# Altium PCB DC Load Control Board.PcbDoc (part 2 of 2)
Units mm, origin at the board's own origin, x right, y up, seen from the top; angles counter-clockwise.
Board outline 70 x 74.5 mm, 4 copper layers (Top Layer, Layer 1, Layer 2, Bottom Layer), stack 0.603 mm thick; 93 components, 78 nets, 360 pads, 209 vias.
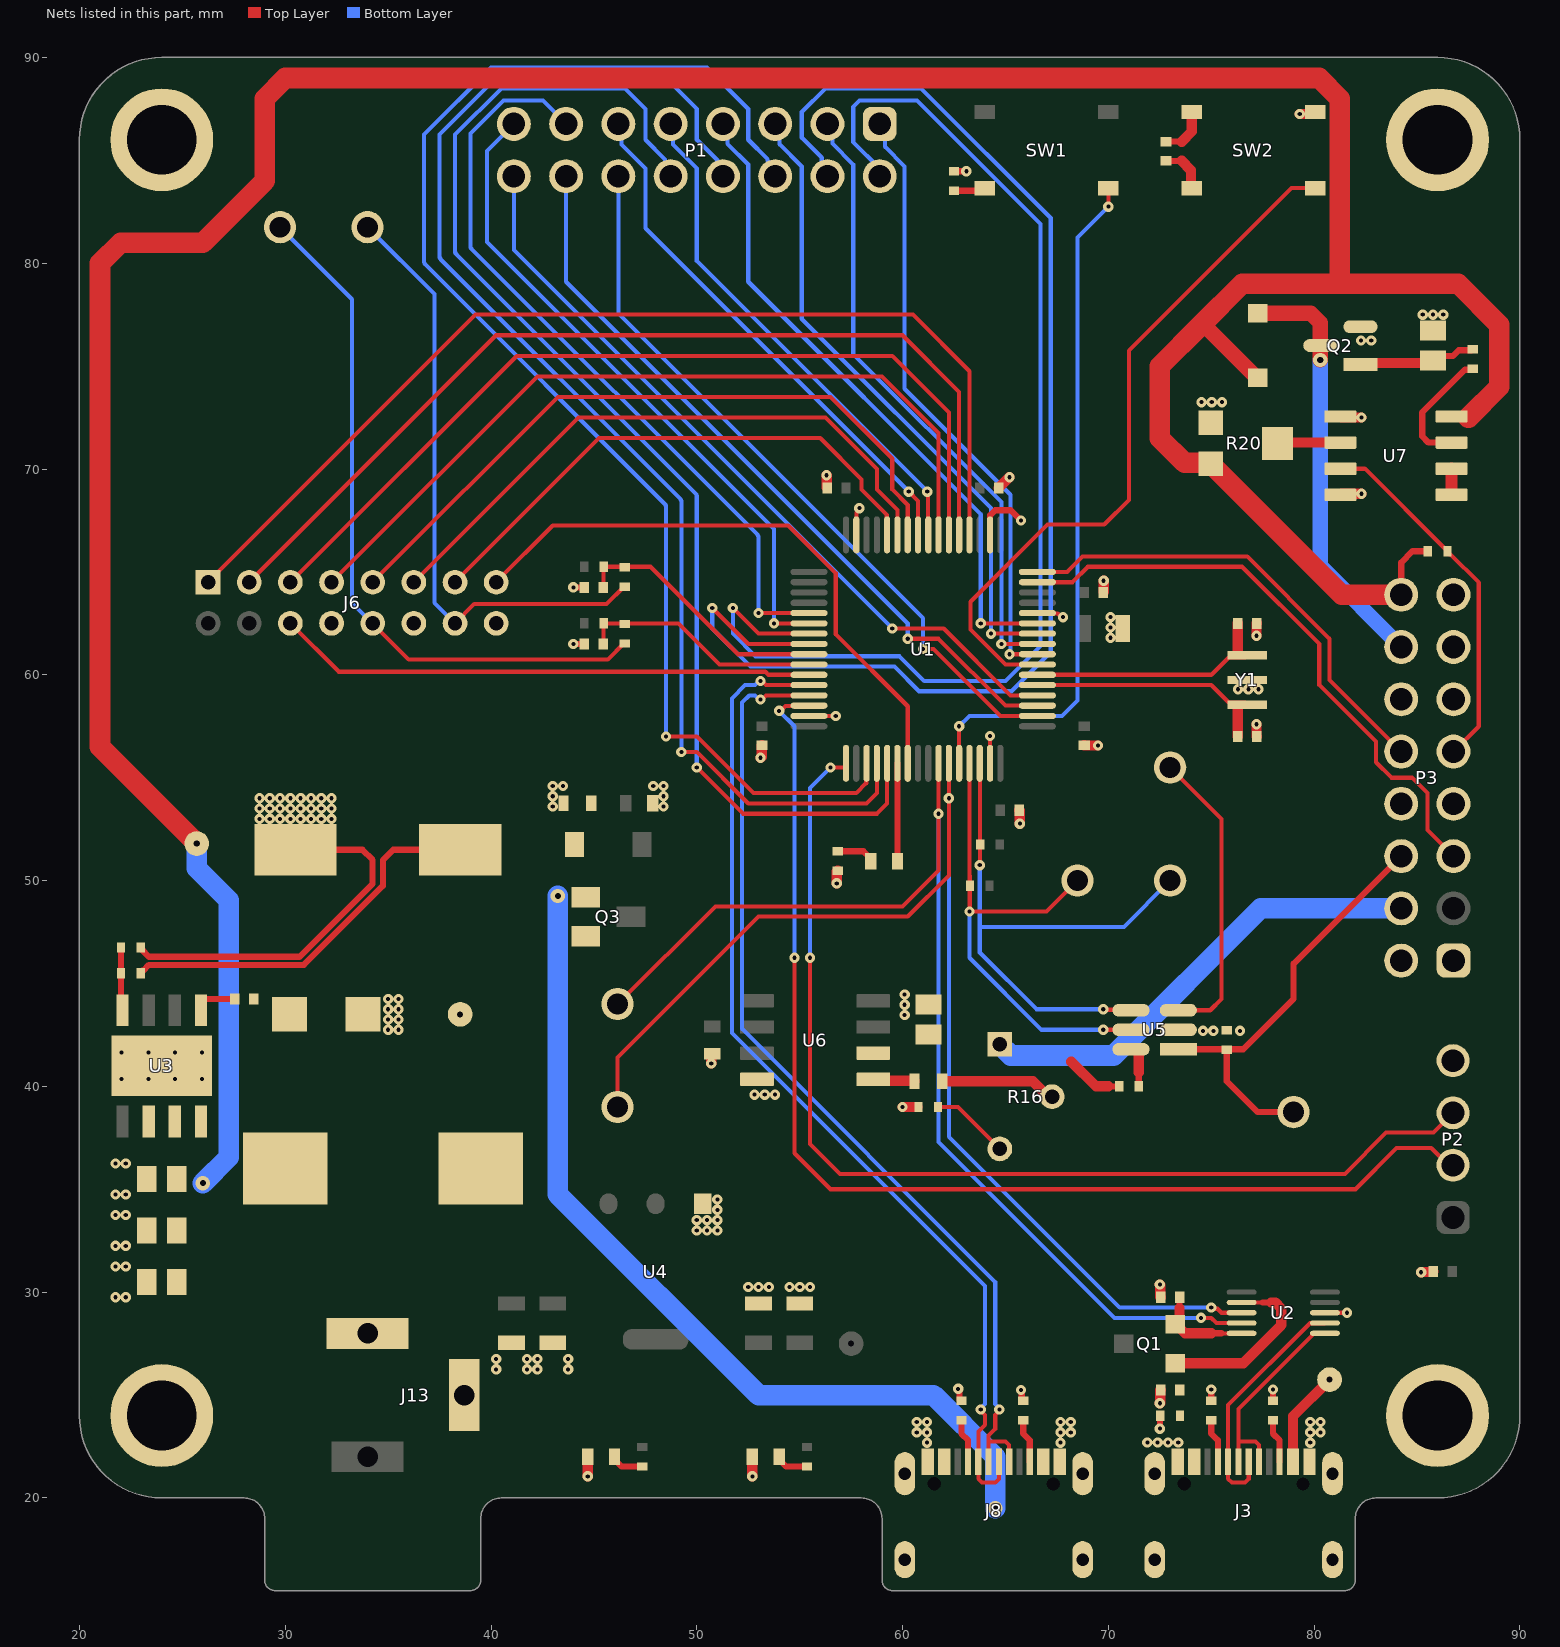
[diagram p4: the nets of this part, all layers, seen from the top]

## Via types
v1: diameter 0.5, hole 0.2, Top Layer to Bottom Layer, tented both sides, 185 vias
v2: diameter 0.7, hole 0.3, Top Layer to Bottom Layer, tented both sides, 16 vias
v3: diameter 0.5, hole 0.2, Top Layer to Bottom Layer, 8 vias

## Nets (pads, with @x,y where several pads share a name; then routed paths per layer and width w, separated by ;. In a path a pad name is that pad's centre, name@x,y a point inside that pad or via, vN(x,y) a via of type N, cw(c..) or ccw(c..) an arc to the next point about the centre after c; other vN are vias at no path point) (continued)
+4.096V: C24.1 J10.1 P3.4 P3.13 R15.2 R16.1 U5.3 U6.6 | length 40.1
  Top Layer w0.2: J10.1@73,55.5 75.5,53 75.5,44.25 74.95,43.7 U5.3@73.4,43.7
  Top Layer w0.3: 70,40 R15.2@70.525,40
  Top Layer w0.5: 68.2,41.2 69.4,40 70,40
  Bottom Layer w1: R16.1@64.725,42.04 65.265,41.5 70.25,41.5 77.4,48.65 P3.4@84.23,48.65
"+5 USB": C1.1 D6.2 J3.A4B9 J3.B4A9 J8.A4B9 J8.B4A9 Q1.1 Q3.1 R3.2 R26.2 TP1.1 U2.7 | length 57
  Top Layer w0.2: U2.7@76.475,29.5 77.5,29.5
  Top Layer w0.3: 77.5,29.5 77.9,29.5
  Top Layer w0.5: Q1.1@73.25,26.55 76.55,26.55 78.4,28.4 78.4,29.207 78.107,29.5 77.9,29.5 ; J3.B4A9@78.97,21.758 78.97,23.97 TP1.1@80.75,25.75
  Bottom Layer w1: v2(43.25,49.25) 43.25,34.75 53,25 61.5,25 64.5,22 v2(64.5,19.5)
+5V: C18.2 L1.2 Q3.2 R10.2 TP3.1 | length 18.8
  Top Layer w0.3: R10.2@22.975,45.5 22.975,45.55 23.048,45.623 23.098,45.623 23.375,45.9 30.9,45.9 34.75,49.75 34.75,51 35.25,51.5 C18.2@38.5,51.5
+12V: C15.1 C16.1 C17.1 D5.2 J13.1 P3.16 R19.1 R20.3 TP2.1 U3.7 U7.8 | length 172.9
  Top Layer w0.3: P3.16@84.231,63.891 84.231,65.456 84.775,66 R19.1@85.525,66
  Top Layer w0.75: 74.5,77 74.65,77 77.225,74.425 D5.2@77.25,74.425
  Top Layer w1: TP2.1@25.7,51.8 21,56.5 21,80 22,81 26,81 29,84 29,88 30,89 80.25,89 81.25,88 81.25,79 ; P3.16@84.23,63.89 81.335,63.89 R20.3@74.975,70.25 74.927,70.298 73.702,70.298 72.5,71.5 72.5,75 74.5,77 76.5,79 81.25,79 ; 87.5,72.5 89,74 89,77 87,79 81.25,79
  Bottom Layer w1: TP2.1@25.7,51.8 25.7,50.6 27.25,49.05 27.25,36.55 v2(26,35.3)
Boot0: SW1.4 U1.60 | length 33.6
  Top Layer w0.2: U1.60@62.75,55.7 v1(62.75,57.5) ; v1(70,82.75) SW1.4@70,83.65
  Bottom Layer w0.2: v1(62.75,57.5) 63.25,58 67.75,58 68.5,58.75 68.5,81.25 v1(70,82.75)
BUCK_PH: C14.2 D2.1 L1.1 U3.8
COL1: J6.9 U1.26 | length 34.2
  Top Layer w0.2: J6.9@34.25,64.5 43.25,73.5 56.5,73.5 59.5,70.5 59.5,69 60.25,68.25 U1.26@60.25,66.8
COL2: J6.11 U1.27 | length 30.5
  Top Layer w0.2: J6.11@36.25,64.5 44.25,72.5 56.25,72.5 58.75,70 58.75,69 59.75,68 U1.27@59.75,66.8
COL3: J6.13 U1.28 | length 26.7
  Top Layer w0.2: J6.13@38.25,64.5 45.25,71.5 56,71.5 58,69.5 58,69 59.232,67.768 59.232,66.818 U1.28@59.25,66.8
COL4: J6.15 U1.55 | length 29.3
  Top Layer w0.2: J6.15@40.25,64.5 43,67.25 54.445,67.25 56.75,64.945 56.75,61.972 60.25,58.472 U1.55@60.25,55.7
DUT_ISEN: P3.5 U1.15 | length 29.2
  Top Layer w0.2: U1.15@66.55,64.5 68.25,64.5 69,65.25 76.5,65.25 80.25,61.5 80.25,59.5 83,56.75 83,55.75 83.75,55 84.75,55 85.5,54.25 85.5,52.46 P3.5@86.77,51.19
DUT_VSEN: P3.10 U1.16 | length 23.1
  Top Layer w0.2: U1.16@66.55,65 68,65 68.75,65.75 76.75,65.75 80.75,61.75 80.75,59.75 P3.10@84.23,56.27
ENCA: C27.1 R23.2 R25.1 U1.41 | length 12.7
  Top Layer w0.2: C27.1@45.46,64.25 45.467,64.258 45.467,65.242 R23.2@45.475,65.25 47.75,65.25 52,61 U1.41@55.45,61
ENCA_Raw: J6.14 J11.1 R25.2 | length 30
  Top Layer w0.2: J6.14@38.25,62.5 39.183,63.433 45.608,63.433 46.45,64.275 R25.2@46.5,64.275
  Bottom Layer w0.2: J11.1@34,81.75 37.25,78.5 37.25,63.5 J6.14@38.25,62.5
ENCB: C26.1 R22.2 R24.1 U1.42 | length 11.8
  Top Layer w0.2: C26.1@45.46,61.5 45.467,61.507 45.467,62.492 R22.2@45.475,62.5 49.1,62.5 51.1,60.5 U1.42@55.45,60.5
ENCB_Raw: J6.10 J7.1 R24.2 | length 34.4
  Top Layer w0.2: J6.10@34.25,62.5 36,60.75 45.675,60.75 46.45,61.525 R24.2@46.5,61.525
  Bottom Layer w0.2: J7.1@29.75,81.75 33.25,78.25 33.25,63.5 J6.10@34.25,62.5
ENCSW: J6.6 U1.43 | length 26.2
  Top Layer w0.2: J6.6@30.25,62.5 32.6,60.15 53.327,60.15 53.477,60 U1.43@55.45,60
FAN-: D5.1 P3.14 Q2.3 | length 20.6
  Top Layer w0.75: D5.1@77.25,77.575 79.825,77.575 80.3,77.1 v2(80.3,75.3)
  Bottom Layer w0.75: v2(80.3,75.3) 80.3,65.28 P3.14@84.23,61.35
GND: C1.2 C2.1 C3.1 C4.1 C6.2 C7.2 C8.2 C9.2 C10.2 C11.2 C12.2 C13.2 C15.2 C16.2 C17.2 C18.1 C19.2 C20.2 C21.2 C22.2 C23.1 C24.2 C25.2 C26.2 C27.2 C28.1 D2.2 D3.2 D4.2 J3.1 J3.2 J3.3 J3.4 J3.A1B12 J3.B1A12 J6.8 J6.12 J6.16 J8.1 J8.2 J8.3 J8.4 J8.A1B12 J8.B1A12 J13.3 P2.4 P3.1 P3.2 P3.7 P3.8 P3.11 P3.12 P3.15 pad.11 Q2.2 R3.1 R4.1 R5.1 R6.1 R7.1 R8.1 R9.1 R12.1 R14.1 R18.1 R20.1 R26.1 SW2.2 U1.12 U1.18 U1.31 U1.47 U1.63 U2.3 U3.6 U3.9 U4.1 U5.2 U6.4 U7.1 U7.4 Y1.2 | length 45.5
  Top Layer w0.2: U1.47@55.45,58 v1(56.75,58) ; U1.31@57.75,66.8 57.769,66.819 57.769,67.888 57.9,68.019 v1(57.9,68.1) ; U1.63@64.25,55.7 v1(64.25,57.025) ; U1.12@66.55,63 66.569,62.981 67.538,62.981 67.719,62.8 v1(67.8,62.8) ; U2.3@80.525,29 v1(81.6,29)
  Top Layer w0.3: R12.1@22.975,46.75 23.048,46.677 23.048,46.627 23.375,46.3 30.7,46.3 34.242,49.842 34.242,51.008 33.75,51.5 C18.1@30.5,51.5 ; v1(44,61.5) C26.2@44.54,61.5 ; v1(44,64.25) C27.2@44.54,64.25 ; R7.1@62.5,84.475 62.504,84.471 63.096,84.471 v1(63.1,84.467) ; v1(62.7,25.3) 62.7,25.246 62.76,25.186 62.76,24.775 62.81,24.725 R9.1@62.86,24.725 ; U1.18@64.25,66.8 64.25,67.75 64.5,68 65.25,68 v1(65.75,67.5) ; v1(65.75,25.25) 65.788,25.212 65.788,24.775 65.838,24.725 R8.1@65.86,24.725 ; v1(72.5,23.367) 72.512,23.38 72.512,23.987 R3.1@72.525,24 ; R6.1@75,24.725 v1(75,25.267) ; R5.1@78,24.725 v1(78,25.267)
  Top Layer w0.5: v1(44.7,21.05) D3.2@44.7,22 ; v1(50.7,41.116) 50.7,41.56 50.73,41.59 C23.1@50.75,41.59 ; v1(52.7,21.05) D4.2@52.7,22 ; v1(53.1,55.967) 53.15,56.017 53.15,56.56 C8.2@53.17,56.58 ; v1(56.3,69.7) 56.31,69.69 56.31,69.1 C9.2@56.33,69.08 ; v1(56.8,49.867) 56.8,50.425 R4.1@56.85,50.475 ; v1(60,39) R18.1@60.709,39 ; C10.2@64.67,69.08 65.19,69.6 v1(65.2,69.6) ; C7.2@65.67,53.42 65.69,53.4 65.69,52.777 v1(65.7,52.767) ; C12.2@68.83,56.58 68.843,56.567 v1(69.5,56.567) ; C11.2@69.77,64.02 v1(69.77,64.57) ; v1(72.5,24.6) 72.52,24.62 72.52,25.23 C1.2@72.54,25.25 ; v1(72.5,30.367) 72.52,30.347 72.52,29.77 C2.1@72.54,29.75 ; v1(77.2,57.6) 77.2,57.01 C4.1@77.21,57 ; v1(77.2,61.9) 77.2,62.49 C3.1@77.21,62.5 ; v1(79.3,87.25) 80,87.25 SW2.2@80.05,87.3 ; U7.4@81.275,68.745 81.325,68.795 82.295,68.795 v1(82.3,68.8) ; U7.1@81.275,72.555 81.325,72.505 82.295,72.505 v1(82.3,72.5) ; v1(85.2,30.967) 85.213,30.98 85.77,30.98 C6.2@85.79,31
  other v1: 61.187,22.687 67.672,22.687 71.894,22.694 72.394,22.694 72.894,22.694 73.394,22.694 79.812,22.687 60.687,23.187 61.187,23.187 67.672,23.187 68.172,23.187 79.812,23.187 80.312,23.187 60.687,23.687 61.187,23.687 67.672,23.687 68.172,23.687 79.812,23.687 80.312,23.687 40.25,26.25 41.75,26.25 42.25,26.25 43.75,26.25 40.25,26.75 41.75,26.75 42.25,26.75 43.75,26.75 21.75,29.75 22.25,29.75 52.5,30.25 53,30.25 53.5,30.25 54.5,30.25 55,30.25 55.5,30.25 21.75,31.25 22.25,31.25 21.75,32.25 22.25,32.25 50,33 50.5,33 51,33 50,33.5 50.5,33.5 51,33.5 21.75,33.75 22.25,33.75 51,34 51,34.5 21.75,34.75 22.25,34.75 21.75,36.25 22.25,36.25 52.8,39.6 53.3,39.6 53.8,39.6 74.6,42.7 75.1,42.7 76.4,42.7 35,42.75 35.5,42.75 35,43.25 35.5,43.25 60.1,43.467 35,43.75 35.5,43.75 60.1,43.967 35,44.25 35.5,44.25 60.1,44.467 28.75,53 29.25,53 29.75,53 30.25,53 30.75,53 31.25,53 31.75,53 32.25,53 28.75,53.5 29.25,53.5 29.75,53.5 30.25,53.5 30.75,53.5 31.25,53.5 31.75,53.5 32.25,53.5 43,53.6 48.385,53.6 28.75,54 29.25,54 29.75,54 30.25,54 30.75,54 31.25,54 31.75,54 32.25,54 43,54.1 48.385,54.1 43,54.6 43.5,54.6 47.885,54.6 48.385,54.6 76.3,59.3 76.8,59.3 77.3,59.3 70.1,61.8 70.1,62.3 70.1,62.8 74.525,73.25 75.025,73.25 75.525,73.25 82.275,76.25 82.775,76.25 85.275,77.5 85.775,77.5 86.275,77.5
  other v3: 22.05,40.35 23.35,40.35 24.65,40.35 25.95,40.35 22.05,41.65 23.35,41.65 24.65,41.65 25.95,41.65
LOAD_CTRL: J9.1 P3.6 R14.2 U5.1 | length 21.1
  Top Layer w0.3: U5.1@73.4,41.8 75.75,41.8 76.55,41.8 79,44.25 79,45.96 P3.6@84.23,51.19 ; R14.2@75.75,41.775 75.75,40.25 77.25,38.75 J9.1@79,38.75
"MCU LED": D1.1 U1.54 | length 4.8
  Top Layer w0.3: D1.1@59.75,50.95 U1.54@59.75,55.7
NetC2_2: C2.2 Q1.2 U2.10 | length 4.8
  Top Layer w0.2: 75.5,28 U2.10@76.475,28
  Top Layer w0.3: 73.46,29.23 C2.2@73.46,29.75 ; 75,28 75.5,28
  Top Layer w0.5: 73.46,29.23 73.46,28.65 73.26,28.45 Q1.2@73.25,28.45 73.275,28.45 73.725,28 75,28
NetC5_1: C5.1 SW2.1 | length 2.4
  Top Layer w0.3: C5.1@72.8,85.91 73.56,85.91
  Top Layer w0.5: 73.56,85.91 74.05,86.4 SW2.1@74.05,87.3
NetC5_2: C5.2 SW2.3 | length 2.3
  Top Layer w0.3: C5.2@72.8,84.974 73.56,84.974
  Top Layer w0.5: 73.56,84.974 74.01,84.524 74.01,83.7 74.05,83.66 SW2.3@74.05,83.6
NetC14_1: C14.1 U3.1 | length 2.1
  Top Layer w0.3: U3.1@25.905,43.7 25.905,44.1 26.055,44.25 C14.1@27.54,44.25
NetC25_1: C25.1 Q2.1 R21.2 | length 5.8
  Top Layer w0.3: C25.1@85.775,75.273 86.002,75.5 86.75,75.5 87.025,75.775 87.65,75.775 R21.2@87.7,75.825
  Top Layer w0.5: Q2.1@82.252,75.085 82.315,75.148 85.651,75.148 C25.1@85.775,75.273
NetD1_2: D1.2 R4.2 | length 1.9
  Top Layer w0.3: R4.2@56.85,51.425 58.1,51.425 58.45,51.075 D1.2@58.45,50.95
NetD3_1: D3.1 R11.1 | length 1.6
  Top Layer w0.3: D3.1@46,22 46,21.875 46.35,21.525 R11.1@47.35,21.525
NetD4_1: D4.1 R13.1 | length 1.6
  Top Layer w0.3: D4.1@54,22 54,21.875 54.35,21.525 R13.1@55.35,21.525
NetJ3_A5: J3.A5 R6.2 | length 2.1
  Top Layer w0.3: R6.2@75,23.775 75,23.125 75.32,22.805 J3.A5@75.32,21.758
NetJ3_B5: J3.B5 R5.2 | length 2.1
  Top Layer w0.3: R5.2@78,23.775 78,23.125 78.32,22.805 J3.B5@78.32,21.758
NetJ4_1: J4.1 R2.1 U1.61 U5.5 | length 24.6
  Top Layer w0.2: R2.1@63.25,49.75 R2.1@63.262,49.737 ; 63.25,50.25 U1.61@63.25,55.7 ; 63.262,50.237 R2.1@63.262,49.737 ; J4.1@68.5,50 67,48.5 v1(63.25,48.5) 63.262,48.512 R2.1@63.262,49.737 ; v1(69.75,42.75) U5.5@71.1,42.75
  Bottom Layer w0.2: v1(63.25,48.5) 63.25,46.25 66.75,42.75 v1(69.75,42.75)
NetJ5_1: J5.1 R1.1 U1.62 U5.4 | length 27.7
  Top Layer w0.2: v1(63.75,50.75) 63.762,50.762 63.762,51.737 63.75,51.75 R1.1@63.762,51.762 ; U1.62@63.75,55.7 63.762,55.688 63.762,52.012 ; v1(69.75,43.75) 69.775,43.725 71.075,43.725 U5.4@71.1,43.7
  Bottom Layer w0.2: v1(63.75,50.75) 63.75,47.75 ; v1(69.75,43.75) 66.5,43.75 63.75,46.5 63.75,47.75 ; J5.1@73,50 70.75,47.75 63.75,47.75
NetJ8_A5: J8.A5 R9.2 | length 2.1
  Top Layer w0.3: R9.2@62.86,23.775 62.86,23.125 63.18,22.805 J8.A5@63.18,21.758
NetJ8_B5: J8.B5 R8.2 | length 2.1
  Top Layer w0.3: R8.2@65.86,23.775 65.86,23.125 66.18,22.805 J8.B5@66.18,21.758
NetR7_2: R7.2 SW1.3 | length 1.6
  Top Layer w0.3: R7.2@62.5,83.525 63.875,83.525 SW1.3@64,83.65
NetR10_1: R10.1 R12.2 U3.4 | length 3.1
  Top Layer w0.3: R12.2@22.025,46.75 22.025,43.77 U3.4@22.095,43.7
NetR15_1: R15.1 U5.6 | length 2.1
  Top Layer w0.3: R15.1@71.475,40 71.475,40.675
  Top Layer w0.5: U5.6@71.1,41.8 71.421,41.8 71.475,41.746 71.475,40.675
NetR16_2: R16.2 R17.2 | length 5.7
  Top Layer w0.5: R17.2@61.925,40.25 66.326,40.25 67.076,39.5 R16.2@67.265,39.5
NetR16_3: R16.3 R18.2 | length 3.9
  Top Layer w0.2: R18.2@61.693,39 62.685,39 R16.3@64.725,36.96
NetR17_1: R17.1 U6.5 | length 2
  Top Layer w0.5: U6.5@58.575,40.345 59.15,40.27 60.575,40.27 R17.1@60.575,40.25
NetR20_2: R20.2 U7.2 | length 3.1
  Top Layer w0.5: R20.2@78.225,71.25 78.26,71.285 U7.2@81.275,71.285
NetR21_1: R21.1 U7.7 | length 6
  Top Layer w0.3: U7.7@86.675,71.285 85.556,71.285 85.25,71.591 85.25,72.75 87.325,74.825 87.65,74.825 R21.1@87.7,74.875
NetU7_5: U7.5 U7.6 | length 1.3
  Top Layer w0.6: U7.5@86.675,68.745 U7.6@86.675,70.015
"Osc In": C4.2 U1.5 Y1.1 | length 12
  Top Layer w0.2: U1.5@66.55,59.5 75,59.5 75.85,58.65 76.65,58.65 Y1.1@76.75,58.55
  Top Layer w0.5: C4.2@76.29,57 Y1.1@76.29,58.4
"Osc Out": C3.2 U1.6 Y1.3 | length 12
  Top Layer w0.2: U1.6@66.55,60 75,60 75.85,60.85 76.65,60.85 Y1.3@76.75,60.95
  Top Layer w0.5: Y1.3@76.29,61.1 C3.2@76.29,62.5
PC0: P1.1 U1.8 | length 29.8
  Top Layer w0.2: v1(65.2,61) U1.8@66.55,61
  Bottom Layer w0.2: P1.1@58.89,86.77 59.138,86.522 59.138,85.662 60.1,84.7 60.1,73.9 65.25,68.75 65.25,61.05 v1(65.2,61)
PC1: P1.3 U1.9 | length 30.5
  Top Layer w0.2: v1(64.8,61.5) U1.9@66.55,61.5
  Bottom Layer w0.2: P1.3@56.35,86.77 56.585,86.535 56.585,85.815 57.6,84.8 57.6,75.6 64.8,68.4 v1(64.8,61.5)
PC2: P1.5 U1.10 | length 31.4
  Top Layer w0.2: v1(64.3,62) U1.10@66.55,62
  Bottom Layer w0.2: P1.5@53.81,86.77 54.015,86.565 54.015,85.785 55.1,84.7 55.1,77.3 64.3,68.1 v1(64.3,62)
PC3: P1.7 U1.11 | length 32.2
  Top Layer w0.2: v1(63.8,62.5) U1.11@66.55,62.5
  Bottom Layer w0.2: P1.7@51.27,86.77 51.495,86.545 51.495,85.805 52.5,84.8 52.5,79.1 63.8,67.8 v1(63.8,62.5)
PC4: P1.9 U1.24 | length 25.2
  Top Layer w0.2: v1(61.2,68.9) 61.231,68.869 61.231,66.819 U1.24@61.25,66.8
  Bottom Layer w0.2: P1.9@48.73,86.77 48.838,86.662 48.838,85.762 50,84.6 50,80.1 v1(61.2,68.9)
PC5: P1.11 U1.25 | length 26
  Top Layer w0.2: v1(60.3,68.9) 60.756,68.444 60.756,66.806 U1.25@60.75,66.8
  Bottom Layer w0.2: P1.11@46.19,86.77 46.338,86.622 46.338,85.762 47.5,84.6 47.5,81.7 v1(60.3,68.9)
PC6: P1.13 U1.37 | length 37.3
  Top Layer w0.2: v1(53,63) 54.7,63 U1.37@55.45,63
  Bottom Layer w0.2: P1.13@43.65,86.77 42.52,87.9 40.6,87.9 39,86.3 39,80.833 ccw(c39.2,80.833) 39.058,80.692 52.942,66.808 cw(c52.8,66.667) 53,66.667 v1(53,63)
PC7: P1.15 U1.38 | length 32.3
  Top Layer w0.2: v1(53.75,62.5) 54.7,62.5 U1.38@55.45,62.5
  Bottom Layer w0.2: P1.15@41.11,86.77 39.8,85.46 39.8,81.033 53.75,67.083 v1(53.75,62.5)
PC8: P1.2 U1.39 | length 58.2
  Top Layer w0.2: v1(51.75,63.25) 53,62 U1.39@55.45,62
  Bottom Layer w0.2: v1(51.75,63.25) 51.75,62 52.85,60.9 59.85,60.9 61.05,59.7 65,59.7 66.7,61.4 66.7,81.9 60.7,87.9 57.9,87.9 57.6,87.6 57.6,85.9 58.89,84.61 P1.2@58.89,84.23
PC9: P1.4 U1.40 | length 64.8
  Top Layer w0.2: v1(50.75,63.25) 52.5,61.5 U1.40@55.45,61.5
  Bottom Layer w0.2: v1(50.75,63.25) 50.75,62.25 52.6,60.4 59.6,60.4 60.8,59.2 65.3,59.2 67.2,61.1 67.2,82.2 60.9,88.5 56.25,88.5 55.1,87.35 55.1,86.1 56.073,85.127 56.073,84.507 P1.4@56.35,84.23
PC10: P1.6 U1.51 | length 67.9
  Top Layer w0.2: v1(48.5,57) 50,57 52.75,54.25 57.75,54.25 58.232,54.732 58.232,55.682 U1.51@58.25,55.7
  Bottom Layer w0.2: v1(48.5,57) 48.5,68.167 ccw(c48.3,68.167) 48.442,68.308 36.808,79.942 cw(c36.95,80.083) 36.75,80.083 36.75,86.25 40,89.5 50.5,89.5 52.5,87.5 52.5,86 53.445,85.055 53.445,84.988 53.81,84.622 P1.6@53.81,84.23
PC11: P1.8 U1.52 | length 65.1
  Top Layer w0.2: v1(49.25,56.25) 50,56.25 52.5,53.75 58.25,53.75 58.75,54.25 U1.52@58.75,55.7
  Bottom Layer w0.2: v1(49.25,56.25) 49.25,68.417 ccw(c49.05,68.417) 49.192,68.558 37.558,80.192 cw(c37.7,80.333) 37.5,80.333 37.5,86.25 40.25,89 48.5,89 50,87.5 50,86 50.993,85.007 50.993,84.507 P1.8@51.27,84.23
PC12: P1.10 U1.53 | length 62.3
  Top Layer w0.2: v1(50,55.5) 52.25,53.25 58.75,53.25 59.25,53.75 U1.53@59.25,55.7
  Bottom Layer w0.2: P1.10@48.73,84.23 48.453,84.507 48.453,85.047 47.5,86 47.5,87.5 46.5,88.5 40.5,88.5 38.25,86.25 38.25,80.582 ccw(c38.45,80.583) 38.308,80.442 49.942,68.808 cw(c49.8,68.667) 50,68.667 v1(50,55.5)
PC13: P1.12 U1.2 | length 36
  Top Layer w0.2: v1(61,61.25) 61.5,61.25 64.75,58 U1.2@66.55,58
  Bottom Layer w0.2: P1.12@46.19,84.23 46.19,77.56 61,62.75 v1(61,61.25)
PC14: P1.14 U1.3 | length 37
  Top Layer w0.2: v1(60.25,61.75) 61.75,61.75 65,58.5 U1.3@66.55,58.5
  Bottom Layer w0.2: P1.14@43.65,84.23 43.65,79.1 60.25,62.5 v1(60.25,61.75)
PC15: P1.16 U1.4 | length 38
  Top Layer w0.2: v1(59.5,62.25) 62,62.25 65.25,59 U1.4@66.55,59
  Bottom Layer w0.2: P1.16@41.11,84.23 41.11,80.64 v1(59.5,62.25)
Reset: SW2.4 U1.7 | length 34.6
  Top Layer w0.2: U1.7@66.55,60.5 65,60.5 63.3,62.2 63.3,63.55 67.05,67.3 69.8,67.3 71,68.5 71,75.75 78.9,83.65 SW2.4@80.05,83.65
ROW1: J6.1 U1.20 | length 51.5
  Top Layer w0.2: J6.1@26.25,64.5 39.25,77.5 60.5,77.5 63.25,74.75 U1.20@63.25,66.8
ROW2: J6.3 U1.21 | length 47.6
  Top Layer w0.2: J6.3@28.25,64.5 40.25,76.5 60,76.5 62.75,73.75 U1.21@62.75,66.8
ROW3: J6.5 U1.22 | length 43.6
  Top Layer w0.2: J6.5@30.25,64.5 41.25,75.5 59.5,75.5 62.25,72.75 U1.22@62.25,66.8
ROW4: J6.7 U1.23 | length 39.7
  Top Layer w0.2: J6.7@32.25,64.5 42.25,74.5 59,74.5 61.75,71.75 U1.23@61.75,66.8
SWDCLK: P2.3 U1.49 | length 52.7
  Top Layer w0.2: v1(55.5,46.25) 55.5,37.2 56.95,35.75 81.5,35.75 83.5,37.75 85.79,37.75 P2.3@86.75,38.71 ; v1(56.5,55.5) 57.204,55.5 57.25,55.546 U1.49@57.25,55.7
  Bottom Layer w0.2: v1(55.5,46.25) 55.5,54.5 v1(56.5,55.5)
SWIO: P2.2 U1.46 | length 57.3
  Top Layer w0.2: v1(54,58.25) 54.081,58.25 54.312,58.481 55.431,58.481 U1.46@55.45,58.5 ; v1(54.75,46.25) 54.75,36.75 56.5,35 82,35 84,37 85.69,37 86.52,36.17 P2.2@86.75,36.17
  Bottom Layer w0.2: v1(54,58.25) 54.75,57.5 v1(54.75,46.25)
TEMP_IN+: P3.9 R19.2 U7.3 | length 17.8
  Top Layer w0.2: U7.3@81.275,70.015 82.46,70.015 86.325,66.15 86.375,66.15 86.475,66.05 86.475,65.95 86.575,65.85 86.625,65.85 88,64.475 88,57.5 P3.9@86.77,56.27
UART_RXD: J1.1 U1.59 U2.8 | length 61.8
  Top Layer w0.2: J1.1@46.15,39 46.15,41.4 53,48.25 60.25,48.25 62.25,50.25 v1(62.25,54) U1.59@62.25,55.7 ; v1(75,29.25) 75.057,29.193 75.307,29.193 75.5,29 U2.8@76.475,29
  Bottom Layer w0.2: v1(62.25,54) 62.25,37.55 70.55,29.25 v1(75,29.25)
UART_TXD: J2.1 U1.58 U2.9 | length 57.8
  Top Layer w0.2: J2.1@46.15,44 50.9,48.75 60,48.75 61.75,50.5 v1(61.75,53.25) U1.58@61.75,55.7 ; v1(74.5,28.75) 75,28.75 75.25,28.5 U2.9@76.475,28.5
  Bottom Layer w0.2: v1(61.75,53.25) 61.75,37.3 70.3,28.75 v1(74.5,28.75)
USB1D_N: J3.A7 J3.B7 U2.2 | length 11.9
  Top Layer w0.2: J3.A7@76.82,21.758 76.82,20.926 76.644,20.75 76,20.75 75.82,20.93 J3.B7@75.82,21.758 75.82,24.52 79.79,28.49 80.515,28.49 U2.2@80.525,28.5
USB1D_P: J3.A6 J3.B6 U2.1 | length 10.2
  Top Layer w0.2: J3.A6@76.32,21.758 76.32,22.75 76.32,24.32 79.915,27.915 79.915,27.977 79.939,28 U2.1@80.525,28 ; 76.325,22.75 77.144,22.75 77.32,22.574 J3.B6@77.32,21.758
USB2D_N: J8.A7 J8.B7 U1.44 | length 49.5
  Top Layer w0.2: v1(53.1,59.7) 53.167,59.7 53.367,59.5 53.998,59.5 U1.44@55.45,59.5 ; v1(63.8,24.3) 63.8,24.233 64,24.033 64,23.555 63.68,23.235 J8.B7@63.68,21.758 63.68,20.93 63.86,20.75 64.504,20.75 64.68,20.926 J8.A7@64.68,21.758
  Bottom Layer w0.2: v1(53.1,59.7) 53.033,59.7 52.83,59.497 52.344,59.497 51.703,58.856 51.703,42.597 64,30.3 64,24.567 63.8,24.367 v1(63.8,24.3)
USB2D_P: J8.A6 J8.B6 U1.45 | length 47.7
  Top Layer w0.2: v1(53.1,58.8) 53.167,58.8 53.367,59 54.205,59 U1.45@55.45,59 ; J8.A6@64.18,21.758 64.18,23.028 64.5,23.348 64.5,24.033 64.7,24.233 v1(64.7,24.3) ; 64.185,22.75 65.004,22.75 65.18,22.574 J8.B6@65.18,21.758
  Bottom Layer w0.2: v1(53.1,58.8) 53.033,58.8 52.83,59.003 52.549,59.003 52.197,58.651 52.197,42.803 64.5,30.5 64.5,24.567 64.7,24.367 v1(64.7,24.3)
pads on no net: J3.6 J3.7 J3.A8 J3.B8 J8.6 J8.7 J8.A8 J8.B8 J13.2 SW1.1 U1.14 U1.17 U1.29 U1.30 U1.33 U1.34 U1.35 U1.36 U1.50 U1.56 U1.57 U2.4 U2.5 U2.6 U3.2 U3.3 U3.5 U6.1 U6.3 U6.7 U6.8

## Polygon pours and split planes (outlines as drawn)
5V_Sel on Top Layer "NONET_L-01_P-001" (solid, pour order 63): 45.9,55.9 45.9,49.8 45.9,47.6 46.1,47.4 48,47.4 49.75,49.15 49.75,50.65 47.1,53.3 47.1,55.9 46.75,56.25 46.25,56.25
5V_Sel on Top Layer "NONET_L-01_P-001" (solid, pour order 69): 40,29 40,30 40.25,30.25 43.75,30.25 44.9,31.4 44.9,35.6 45.1,35.8 46.3,35.8 46.5,35.6 46.5,30.75 44.5,28.75 40.25,28.75
"+5 USB" on Top Layer "NONET_L-01_P-001" (solid, pour order 68): 45.5,54.25 45.5,49.8 45.5,48.5 45.25,48.25 42.75,48.25 42.25,48.75 42.25,51.25 44.3,53.3 44.3,54.3 44.5,54.5 45.25,54.5
+5V on Top Layer "Top Layer-+5V" (solid, pour order 67): 36.75,33.5 41.75,33.5 42,33.75 42,46 42.5,46.5 45.25,46.5 45.5,46.75 45.5,47.75 45.25,48 42.5,48 42,48.5 42,53.25 41.75,53.5 36.75,53.5 36.5,53.25 36.5,33.75
GND on Top Layer "NONET_L-01_P-001" (solid, pour order 65): 47.685,53.3 48.485,53.3 48.685,53.5 48.685,54.7 48.485,54.9 47.685,54.9 47.485,54.7 47.485,53.5
GND on Top Layer "NONET_L-01_P-001" (solid, pour order 64): 43.7,53.3 42.9,53.3 42.7,53.5 42.7,54.7 42.9,54.9 43.7,54.9 43.9,54.7 43.9,53.5
GND on Top Layer "NONET_L-01_P-001" (solid, pour order 59): 74.4,71.5 75.7,71.5 76,71.8 76,73.4 75.8,73.6 74.4,73.6 74.2,73.4 74.2,71.7
GND on Top Layer "NONET_L-01_P-001" (solid, pour order 58): 86.6,76.4 86.6,77.6 86.4,77.8 81.6,77.8 81.4,77.6 81.4,76.7 82.1,76 82.9,76 83.1,76.2 86.4,76.2
GND on Top Layer "NONET_L-01_P-001" (solid, pour order 57): 75.9,60.1 77.6,60.1 77.8,59.9 77.8,59.2 77.6,59 75.9,59 75.7,59.2 75.7,59.9
GND on Top Layer "NONET_L-01_P-001" (solid, pour order 56): 70,63.1 71,63.1 71.1,63 71.1,61.6 71,61.5 70,61.5 69.8,61.7 69.8,62.9
"+5 USB" on Top Layer "Top Layer-+5 USB" (solid, pour order 55): 62,18.9 79,18.9 79.3,19.2 79.3,22.6 78.6,22.6 78.6,21.1 78,20.5 75.1,20.5 74.5,21.1 74.5,27.1 74.3,27.3 72.7,27.3 72.5,27.1 72.5,26.1 73.1,25.5 73.1,23.6 73.8,22.9 73.8,20.5 67.2,20.5 67.2,22.4 66.5,22.4 66.457,22.357 66.457,21.057 65.741,20.341 63.159,20.341 62.4,21.1 62.4,22.4 61.7,22.4 61.7,19.2
+3V3 on Top Layer "NONET_L-01_P-001" (solid, pour order 52): 64.7,56.7 65.4,56.7 65.6,56.9 65.6,57.6 65.8,57.8 69.1,57.8 69.2,57.7 69.2,57.2 69.1,57.1 67.7,57.1 67.5,56.9 67.5,55 67.3,54.8 65.9,54.8 65.2,54.1 65.2,49.6 65,49.4 64,49.4 63.9,49.5 63.9,50 64,50.1 64.2,50.1 64.3,50.2 64.3,54.5 64.5,54.7 64.5,56.5
+4.096V on Top Layer "Top Layer-+4.096V" (solid, pour order 51): 74,46.25 64,46.25 63.5,45.75 63.5,43.75 62.85,43.1 60.5,43.1 59.65,42.25 57.25,42.25 57.25,41 60,41 60.25,41.25 62.25,41.25 62.5,41 68.75,41 69.25,41.5 69.25,44 69.75,44.5 71.75,44.5 72.25,44 72.25,43.5 72.5,43.25 74.25,43.25 74.5,43.5 74.5,45.75
GND on Top Layer "NONET_L-01_P-001" (solid, pour order 48): 76.7,42.9 76.7,42.5 76.5,42.3 72.6,42.3 72.3,42.6 72.3,43.1 76.5,43.1
GND on Top Layer "NONET_L-01_P-001" (solid, pour order 47): 60,44.8 62,44.8 62.2,44.6 62.2,43.6 62,43.4 60.4,43.4 60.2,43.2 60,43.2 59.8,43.4 59.8,44.6
GND on Top Layer "NONET_L-01_P-001" (solid, pour order 46): 52.1,40.9 53.9,40.9 54.1,40.7 54.1,39.5 53.9,39.3 52.1,39.3 51.9,39.5 51.9,40.7
GND on Top Layer "NONET_L-01_P-001" (solid, pour order 39): 71.8,23 73.5,23 73.7,22.8 73.7,21.1 73,21.1 73,22.2 72.8,22.4 71.8,22.4 71.6,22.6 71.6,22.8
GND on Top Layer "NONET_L-01_P-001" (solid, pour order 38): 80.4,24 79.6,24 79.4,23.8 79.4,21 80.2,21 80.2,22.6 80.6,23 80.6,23.8
GND on Top Layer "NONET_L-01_P-001" (solid, pour order 37): 68.26,24 67.46,24 67.26,23.8 67.26,21 68.06,21 68.06,22.6 68.46,23 68.46,23.8
GND on Top Layer "NONET_L-01_P-001" (solid, pour order 36): 60.6,24 61.4,24 61.6,23.8 61.6,21 60.8,21 60.8,22.6 60.4,23 60.4,23.8
GND on Top Layer "NONET_L-01_P-001" (solid, pour order 22): 49.5,34.75 49.5,32.75 49.75,32.5 51.5,32.5 51.75,32.75 51.75,34.75 51.5,35 49.75,35
GND on Top Layer "NONET_L-01_P-001" (solid, pour order 21): 52.25,29 55.75,29 56,29.25 56,30.75 55.75,31 52.25,31 52,30.75 52,29.25
GND on Top Layer "NONET_L-01_P-001" (solid, pour order 20): 28.5,54.5 32.25,54.5 32.5,54.25 32.5,50.25 28.5,50.25 28.25,50.5 28.25,54.25
GND on Top Layer "NONET_L-01_P-001" (solid, pour order 19): 32.75,45 32.75,42.25 33,42 35.75,42 36,42.25 36,45 35.75,45.25 33,45.25
GND on Top Layer "NONET_L-01_P-001" (solid, pour order 18): 23.75,29.5 23.25,29 21.5,29 21,29.5 21,36.5 21.5,37 22.75,37 23,37.25 23,40 23.75,40
GND on Top Layer "NONET_L-01_P-001" (solid, pour order 17): 37.75,28.25 43.5,28.25 44,27.75 44,25.25 41.5,22.75 37.75,22.75 37.25,23.25 37.25,27.75
BUCK_PH on Top Layer "NONET_L-01_P-001" (solid, pour order 1): 25.5,39.2 25.5,37.25 27,35.75 27,33.75 27.25,33.5 32.25,33.5 32.5,33.75 32.5,45 32.25,45.25 28.45,45.25 28.2,45 28.2,40.45 26.95,39.2
+12V on Top Layer "NONET_L-01_P-001" (solid, pour order 0): 24.2,39.2 25,39.2 25,37 26.5,35.5 26.5,33.5 27,33 36.25,33 36.5,32.75 36.5,26.75 36.25,26.5 27.25,26.5 24.2,29.55
no net on Top Overlay "NONET_L-01_P-001" (solid): 84.4,29.7 84.2,29.7 81.4,26.4 84.2,28.3 84.4,28.3
+3V3 on Bottom Layer "NONET_L-01_P-001" (solid, pour order 53): 66.2,54.8 67.3,54.8 67.5,55 67.5,56.9 66,56.9 66,55
+4.096V on Bottom Layer "NONET_L-01_P-001" (solid, pour order 49): 83.5,47.5 85,47.5 85.5,48 85.5,49.25 86,49.75 89.25,49.75 89.75,50.25 89.75,62 89.25,62.5 86,62.5 85.5,62 85.5,60.5 86,60 87.5,60 88,59.5 88,55.5 87.5,55 83.5,55 83,54.5 83,48
GND on Layer 2 "NONET_L-01_P-001" (solid, pour order 12): 20,90 90,90 90,15 20,15
GND on Layer 1 "NONET_L-01_P-001" (solid, pour order 9): 20,90 90,90 90,15 20,15

## Keep-outs
Top Layer:
  circle w0.254: c24,24 r3.808
  circle w0.254: c86,24 r3.808
  circle w0.254: c24,86 r3.808
  circle w0.254: c86,86 r3.808

## Silkscreen, mask and mechanical layers (free items; w line width, h text height)
Top Overlay:
  drawing of 26 lines, arcs and shapes, not listed
  text "GPIO:  PC0 - 15" at 39.65,80.935 h2
  text "BOOT0" at 64,80.285 h1.7
  text "RESET" at 74.05,80.285 h1.7
  text "ENCB" at 27.758,78.552 h1.2
  text "ENCA" at 32.008,78.552 h1.2
  text "Control Board / WK / Nov 2024" at 24.5,68.139 h1.7
  text "TEMP" at 74.34,67.356 h1.7
  text "TO DIGITAL IO" at 24.25,59.035 h2
  text "4.096V" at 71.008,52.25 h1.2
  text "12V" at 22.287,51.008 h1.2
  text "PD2" at 57.8,48.5 h1.2
  text "SCl" at 67.361,46.75 h1.2
  text "SDA" at 71.588,46.75 h1.2
  text "* Pins Face Down" at 80.777,44.675 h1.2 r90
  text "TO E-LOAD" at 82.965,44.675 h2 r90
  text "5V" at 39.467,42.708 h1.2
  text "UART TX" at 43.525,40.75 h1.2
  text "GND" at 81.75,40.395 h1
  text "SWCLK" at 81.655,37.855 h1
  text "UART RX" at 43.338,35.75 h1.2
  text "DAC" at 77.605,35.5 h1.2
  text "SWIO" at 81.75,35.315 h1
  text "4.096V / CAL." at 68.5,34.6 h2
  text "3V3" at 81.75,32.775 h1
  text "USB" at 61.8,28.363 h1.2
  text "UART" at 65.05,28.363 h1.2
  text "VBUS" at 84.236,28.3 h1.2
  text "3V3" at 56.061,24.958 h1.2
  text "5V" at 42,21.25 h1.2
  text "3V3" at 49.4,21.25 h1.2
  text "JLCJLCJLCJLC" at 30.996,17.004 h0.85 r90
Bottom Overlay:
  lines w0.1: 77.4,47.8 80,47.8 80,49.6 77.4,49.6 77.4,47.8 ; 77.4,50.34 80,50.34 80,52.14 77.4,52.14 77.4,50.34 ; 77.4,55.42 80,55.42 80,57.22 77.4,57.22 77.4,55.42 ; 77.4,60.5 80,60.5 80,62.3 77.4,62.3 77.4,60.5 ; 77.4,63.1 80,63.1 80,64.9 77.4,64.9 77.4,63.1 ; 80.3,47.8 82.9,47.8 82.9,49.6 80.3,49.6 80.3,47.8 ; 80.3,50.34 82.9,50.34 82.9,52.14 80.3,52.14 80.3,50.34 ; 80.3,55.42 82.9,55.42 82.9,57.22 80.3,57.22 80.3,55.42 ; 80.3,60.5 82.9,60.5 82.9,62.3 80.3,62.3 80.3,60.5
  lines w0.2: 24.5,68 35.4,68 35.4,73 24.5,73 24.5,68
  text "GPIO:  PC0 - 15" at 60.3,80.935 h2
  text "Control Board / WK / Nov 2024" at 35.5,68.139 h1.7
  text "4V" at 79.985,63.095 h1
  text "GND" at 82.885,63.035 h1
  text "4V" at 82.885,60.495 h1
  text "FAN" at 80.015,60.485 h1
  text "TO DIGITAL IO" at 42.25,59.035 h2
  text "GND" at 82.885,57.955 h1
  text "GND" at 80.015,57.945 h1
  text "Tmp" at 82.885,55.415 h1
  text "Vsen" at 80.036,55.405 h1
  text "GND" at 82.885,52.875 h1
  text "GND" at 80.015,52.865 h1
  text "12V" at 24.713,51.008 h1.2
  text "Isen" at 82.885,50.335 h1
  text "DAC" at 80.015,50.325 h1
  text "3V3" at 82.885,47.795 h1
  text "4V" at 80.015,47.785 h1
  text "GND" at 82.885,45.255 h1
  text "GND" at 80.015,45.245 h1
  text "5V" at 41.333,42.708 h1.2
  text "GND" at 85.405,40.395 h1
  text "SWCLK" at 85.5,37.855 h1
  text "SWIO" at 85.405,35.315 h1
  text "3V3" at 85.405,32.775 h1
  text "3V3" at 58.939,24.958 h1.2

## Dimensions
86,86 to 86.77,63.89 on Top Overlay
86.77,46.11 to 90,24 on Top Overlay